# Altium PCB A313_5.PcbDoc (part 3 of 4)
Units mm, origin at the board's own origin, x right, y up, seen from the top; angles counter-clockwise.
Board outline 230.01 x 157.01 mm, 2 copper layers (Top Layer, Bottom Layer); 173 components, 153 nets, 1229 pads, 884 vias.
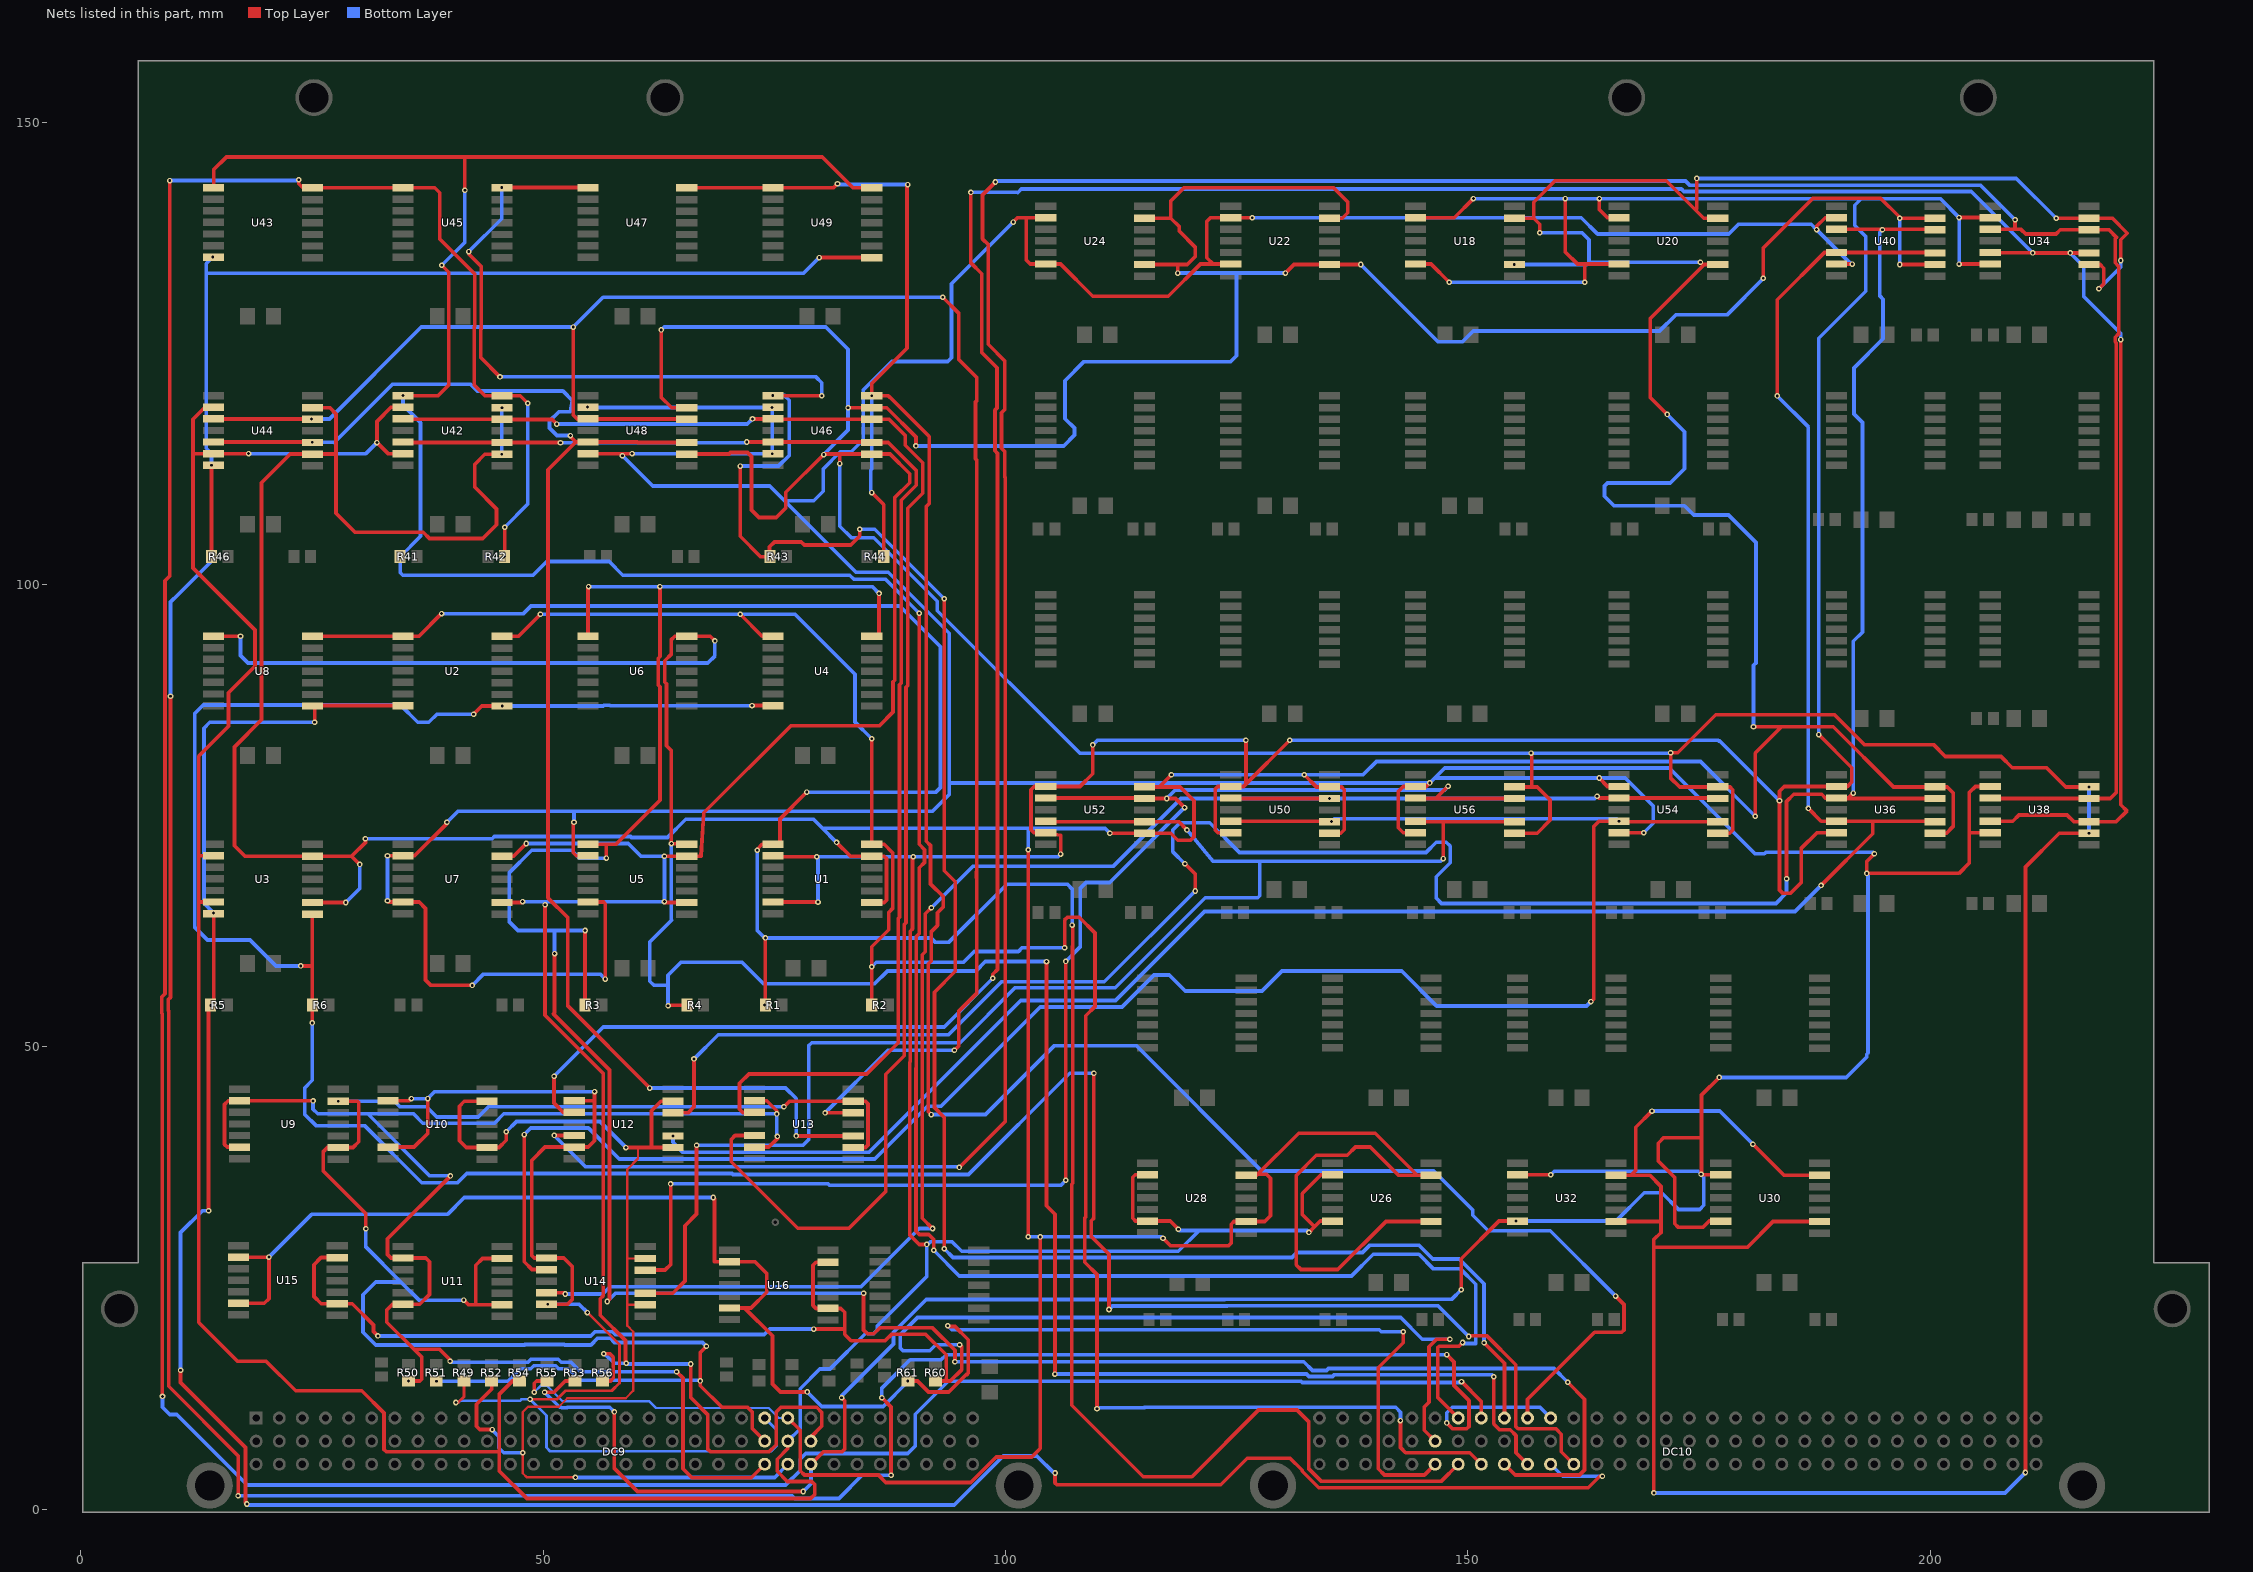
[diagram p3: the nets of this part, all layers, seen from the top]

## Via types
v1: diameter 0.6, hole 0.3, Top Layer to Bottom Layer, 884 vias

## Nets (pads, with @x,y where several pads share a name; then routed paths per layer and width w, separated by ;. In a path a pad name is that pad's centre, name@x,y a point inside that pad or via, vN(x,y) a via of type N, cw(c..) or ccw(c..) an arc to the next point about the centre after c; other vN are vias at no path point) (continued)
u12.3: U12.3 U34.5 U34.10 U38.5 U38.10 | length 355.3
  Top Layer w0.4: v1(51.165,46.807) 51.165,43.91 52.175,42.9 U12.3@53.35,42.9 ; v1(96.25,142.4) 96.25,134.757 97.416,133.591 97.416,125.09 99.081,123.425 99.081,119.082 98.853,118.853 98.853,114.447 99.137,114.162 99.137,58.355 98.625,57.843 v1(98.625,57.4) ; U38.5@206.496,74.4 208.925,74.4 209.6,75.075 214.802,75.075 215.527,74.35 220.11,74.35 221.268,75.508 220.611,76.166 v1(220.611,126.481) ; U34.5@206.496,135.9 211.084,135.873 v1(215.14,135.85) ; v1(211.084,135.85) v1(215.14,135.85) ; U34.10@217.171,135.85 v1(215.14,135.85)
  Bottom Layer w0.4: v1(51.165,46.807) 56.499,52.14 93.365,52.14 v1(98.625,57.4) ; v1(96.25,142.4) 101.273,142.4 101.304,142.369 101.703,142.767 173.088,142.767 173.353,142.502 204.431,142.502 v1(211.084,135.85) ; v1(215.14,135.85) 216.59,134.4 216.59,131.164 220.611,127.143 v1(220.611,126.481)
u12.5: U12.5 U34.3 U34.12 U38.3 U38.12 | length 359.8
  Top Layer w0.4: v1(51.19,40.405) 51.195,40.4 U12.5@53.35,40.4 ; v1(94.98,36.951) 99.98,41.952 99.98,111.511 99.915,111.576 99.915,114.374 99.553,114.736 99.553,118.564 99.915,118.926 99.915,124.178 98.116,125.977 98.116,136.751 97.498,137.37 97.498,142.123 v1(98.9,143.525) v1@98.9,143.5 ; U38.3@206.496,76.9 206.546,76.85 219.465,76.85 220.111,77.496 220.111,126.133 220.011,126.233 220.011,126.73 220.375,127.094 220.375,134.419 220.011,134.783 220.011,137.391 220.154,137.534 219.338,138.35 214.067,138.35 213.618,137.9 210.328,137.9 209.828,138.4 209.25,138.4 ; U34.3@206.496,138.4 209.25,138.4 ; v1(209.178,139.44) 209.178,138.472 209.25,138.4
  Bottom Layer w0.4: v1(51.19,40.405) 54.58,37.016 94.915,37.016 v1(94.98,36.951) ; v1(98.9,143.525) 99.006,143.631 173.532,143.631 174.007,143.156 205.462,143.156 v1(209.178,139.44)
u12.10: U12.10 U36.5 U36.10 U40.5 U40.10 | length 236.4
  Top Layer w0.4: v1(183.448,120.39) 183.448,130.795 188.553,135.9 200.475,135.9 U40.10@200.525,135.85 ; v1(186.825,75.775) 188.2,74.4 193.775,74.4 ; v1(188.2,67.45) 193.775,73.025 193.775,74.4 ; U36.10@200.525,74.35 200.475,74.4 193.775,74.4
  Bottom Layer w0.4: v1(64.025,40.35) 64.025,39.675 65.124,38.576 85.215,38.576 101.636,54.997 111.883,54.997 121.523,64.637 185.387,64.637 v1(188.2,67.45) ; v1(183.448,120.39) 186.825,117.013 v1(186.825,75.775)
u12.12: U12.12 U36.3 U36.12 U40.3 U40.12 | length 256.8
  Top Layer w0.4: U12.12@64.025,42.85 65.649,42.85 66.303,43.504 v1(66.303,48.686) ; v1(119.4,69.793) 120.505,68.688 v1(120.505,66.845) ; v1(184.464,68.167) 184.464,76.524 185.24,77.3 188.26,77.3 188.66,76.9 U36.3@189.85,76.9 ; U40.3@189.85,138.4 v1@194.775,138.4 ; v1(191.677,77.433) 191.144,76.9 U36.3@189.85,76.9 ; v1(194.827,138.348) v1@194.775,138.4 ; U36.12@200.525,76.85 189.9,76.85 U36.3@189.85,76.9 ; U40.12@200.525,138.35 200.475,138.4 v1@194.775,138.4
  Bottom Layer w0.4: v1(66.303,48.686) 68.919,51.302 93.828,51.302 99.549,57.023 110.683,57.023 v1(120.505,66.845) ; v1@119.388,69.781 118.094,71.075 118.094,73.476 118.856,74.238 122.081,74.238 125.307,71.012 145.465,71.012 146.575,72.122 147.659,72.122 148.083,71.698 148.083,69.912 146.567,68.396 146.567,66.085 147.151,65.5 183.321,65.5 184.464,66.643 v1(184.464,68.167) ; v1(191.677,77.433) 191.677,93.847 192.668,94.837 192.668,117.52 191.754,118.434 191.754,123.412 194.903,126.562 194.903,130.837 194.556,131.185 194.556,138.076 v1(194.827,138.348)
u13.3: U13.3 U42.5 U42.10 U46.5 U46.10 | length 143
  Top Layer w0.4: U42.5@34.85,115.4 34.9,115.35 U42.10@45.525,115.35 51.849,115.35 v1(51.866,115.332) ; v1(72.01,115.403) 73.912,115.403 U46.5@74.85,115.4 85.475,115.4 U46.10@85.525,115.35 87.305,115.35 90.338,112.317 90.338,110.72 88.722,109.104 88.722,89.349 88.533,89.16 88.533,64.036 88.381,63.884 88.381,50.443 84.997,47.06 72.247,47.06 71.231,46.044 71.231,43.25 71.581,42.9 U13.3@72.85,42.9
  Bottom Layer w0.4: v1(51.866,115.332) 71.939,115.332 v1(72.01,115.403)
u13.5: U13.5 U42.3 U42.12 U46.3 U46.12 | length 166.1
  Top Layer w0.4: U42.3@34.85,117.9 34.9,117.85 46.766,117.85 46.778,117.838 50.965,117.838 v1(51.461,117.342) ; v1(72.628,117.9) U46.3@74.85,117.9 74.9,117.85 87.41,117.85 89.142,116.117 89.142,115.057 91.038,113.162 91.038,109.86 89.422,108.244 89.422,89.059 89.233,88.87 89.233,63.428 89.035,63.23 89.035,49.021 87.029,47.015 87.029,34.343 83.067,30.38 77.52,30.38 70.325,37.575 70.325,39.975 70.75,40.4 U13.5@72.85,40.4
  Bottom Layer w0.4: v1(51.461,117.342) 72.07,117.342 v1(72.628,117.9)
u13.10: U13.10 U44.5 U44.10 U48.5 U48.10 | length 164.6
  Top Layer w0.4: U44.5@14.35,115.4 24.975,115.4 U44.10@25.025,115.35 v1(25.025,115.375) ; v1(52.943,116.097) 52.943,115.973 53.515,115.4 ; v1(61.528,45.536) 52.663,54.401 52.663,63.951 50.515,66.099 50.515,112.4 53.515,115.4 ; U48.10@65.525,115.35 60.206,115.35 60.156,115.4 53.515,115.4 ; v1(77.352,40.354) 77.356,40.35 U13.10@83.525,40.35
  Bottom Layer w0.4: v1(25.025,115.375) 27.372,115.375 27.397,115.35 33.697,121.65 42.133,121.65 42.865,120.918 52.123,120.918 53.163,119.877 52.901,118.68 51.69,118.68 50.682,117.672 50.682,116.91 51.495,116.097 v1(52.943,116.097) ; v1(61.528,45.536) 76.209,45.536 77.352,44.393 v1(77.352,40.354)
u13.12: U13.12 U44.3 U44.12 U48.3 U48.12 | length 210.3
  Top Layer w0.4: U44.3@14.35,117.9 24.975,117.9 v1(24.95,117.9) ; v1(53.247,127.832) 53.247,118.332 53.679,117.9 65.475,117.9 U48.12@65.525,117.85 ; v1(80.476,42.85) U13.12@83.525,42.85 ; v1(93.208,131.058) 94.95,129.316 94.95,124.292 96.899,122.343 96.899,119.869 96.753,119.723 96.753,113.577 96.899,113.431 96.899,68.99 96.846,68.937 96.846,68.313 96.899,68.26 96.899,55.812 94.95,53.863 94.95,50.104 v1(94.472,49.625)
  Bottom Layer w0.4: v1(24.95,117.9) 26.881,117.9 36.813,127.832 v1(53.247,127.832) 56.473,131.058 v1(93.208,131.058) ; v1(80.476,42.85) 87.252,49.625 v1(94.472,49.625)
u14.3: U14.3 U50.5 U50.10 U54.5 U54.10 | length 220.2
  Top Layer w0.4: v1(47.939,40.507) 47.939,26.74 48.779,25.9 U14.3@50.35,25.9 ; U50.5@124.35,74.4 135.2,74.4 v1(135.25,74.35) ; v1(163.306,54.883) 163.625,55.203 163.625,73.856 164.169,74.4 v1(166.35,74.4) 166.4,74.35 U54.10@177.025,74.35
  Bottom Layer w0.4: v1(47.939,40.507) 48.642,41.21 54.881,41.21 58.226,37.865 85.861,37.865 91.564,43.568 93.012,43.568 103.741,54.297 112.605,54.297 116.062,57.753 117.713,57.753 119.44,56.026 127.746,56.026 129.905,58.185 142.834,58.185 146.619,54.401 162.823,54.401 v1(163.306,54.883) ; v1(135.25,74.35) 135.562,74.662 166.088,74.662 v1(166.35,74.4)
u14.5: U14.5 U50.3 U50.12 U54.3 U54.12 | length 181.1
  Top Layer w0.4: U14.5@50.35,23.4 52.244,23.4 v1(52.384,23.26) ; v1(91.979,65.04) 91.324,64.384 91.324,60.287 90.997,59.96 90.997,31.453 v1(92.103,30.347) ; U50.3@124.35,76.9 124.4,76.85 v1(135.025,76.85) ; v1(163.972,77.102) 164.174,76.9 U54.3@166.35,76.9 176.975,76.9 U54.12@177.025,76.85
  Bottom Layer w0.4: v1(52.384,23.26) 56.406,23.26 57.198,24.052 84.367,24.052 90.662,30.347 v1(92.103,30.347) ; v1(91.979,65.04) 96.445,69.506 111.617,69.506 118.961,76.85 v1(135.025,76.85) 163.72,76.85 v1(163.972,77.102)
u14.10: U14.10 U52.5 U52.10 U56.5 U56.10 | length 161.7
  Top Layer w0.4: U14.10@61.025,23.35 64.017,23.35 65.32,24.653 65.32,30.653 66.582,31.915 v1(66.582,39.338) ; U52.5@104.35,74.4 104.4,74.35 118.718,74.35 v1(119.616,73.452) ; U56.5@144.35,74.4 144.4,74.35 147.25,74.35 ; v1(147.329,70.352) 147.329,74.271 147.25,74.35 ; U56.10@154.975,74.4 U56.10@155.025,74.35 147.25,74.35
  Bottom Layer w0.4: v1(66.582,39.338) 78.089,39.338 78.698,39.948 78.698,50.108 79.028,50.438 95.097,50.438 101.028,56.369 111.858,56.369 121.599,66.11 127.282,66.11 127.5,66.328 127.5,70.065 127.49,70.075 ; v1(119.616,73.452) 122.442,70.075 127.49,70.075 ; v1(147.329,70.352) 147.052,70.075 127.49,70.075
u14.12: U14.12 U52.3 U52.12 U56.3 U56.12 | length 160.8
  Top Layer w0.4: U14.12@61.025,25.85 63.179,25.85 63.788,26.46 63.777,26.471 v1(63.777,35.17) ; U52.3@104.35,76.9 114.975,76.9 U52.12@115.025,76.85 v1(117.433,76.85) 118.377,76.85 v1(119.364,75.864) ; v1(106.511,35.554) v1(106.511,59.227) ; U56.3@144.35,76.9 144.4,76.85 U56.12@155.025,76.85 ; 146.587,76.9 v1(147.862,78.175)
  Bottom Layer w0.4: v1(63.777,35.17) 80.807,35.17 80.942,35.035 105.992,35.035 v1(106.511,35.554) ; v1(106.511,59.227) 108.061,60.776 108.061,67.126 108.689,67.754 111.137,67.754 111.156,67.736 111.236,67.736 v1(119.364,75.864) ; v1(117.433,76.85) 118.36,77.777 147.464,77.777 v1(147.862,78.175)
"upr. c1": DC10.A6 R61.1 U15.2 U15.6 U16.2 U16.6 | length 195
  Top Layer w0.4: U15.6@17.05,22.25 19.821,22.25 20.329,22.758 v1(20.329,27.25) U15.2@17.05,27.25 ; v1(68.382,33.7) 68.514,33.568 68.514,26.774 68.538,26.75 72.911,26.75 74.177,25.484 74.177,23.452 72.475,21.75 71.776,21.75 ; U16.6@70.125,21.75 71.776,21.75 ; v1(78.546,12.668) 75.65,12.668 74.787,13.532 74.787,18.739 71.776,21.75 ; v1(89.425,13.85) 90.483,13.85 91.665,12.668 93.863,12.668 95.756,14.562 95.837,14.562 95.975,14.7 95.975,18.314 94.539,19.75 93.816,19.75 v1(93.735,19.831) ; v1(143,19.175) 143,17.991 140.296,15.287 140.296,4.372 140.972,3.696 145.296,3.696 DC10.A6@146.45,4.85
  Bottom Layer w0.4: v1(20.329,27.25) 24.95,31.871 39.633,31.871 41.462,33.7 v1(68.382,33.7) ; v1(78.546,12.668) 80.11,11.105 86.76,11.105 89.425,13.769 v1(89.425,13.85) ; v1(93.735,19.831) 94.166,19.4 140.425,19.4 140.65,19.175 v1(143,19.175)
"upr. c2": DC10.B6 R60.1 U15.9 U15.13 U16.9 U16.13 | length 183
  Top Layer w0.4: U15.13@27.725,27.2 25.975,27.2 25.2,26.425 25.2,23 26,22.2 U15.9@27.725,22.2 29.35,22.2 31.65,19.9 31.65,19.2 v1(32.125,18.725) ; v1(79.257,19.469) 82.577,19.469 82.596,19.45 ; U16.13@80.8,26.7 79.511,26.7 79.181,26.37 79.181,22.03 79.511,21.7 82.175,21.7 82.596,21.279 82.596,19.45 ; R60.1@92.425,13.85 93.575,13.85 ; v1(95.03,17.774) 95.275,17.529 95.275,15.108 94.017,13.85 93.575,13.85 ; DC10.B6@146.45,7.35 145.272,8.528 145.272,11.043 145.794,11.565 145.794,17.56 146.609,18.375 v1(148.05,18.375) ; 82.596,19.45 82.596,18.891 83.295,18.193 86.951,18.193 87.653,18.895 91.37,18.895 93.579,16.685 93.579,14.858 93.575,14.854 93.575,13.85
  Bottom Layer w0.4: v1(32.125,18.725) 55.137,18.725 55.574,19.163 57.524,19.163 57.816,18.871 73.912,18.871 74.511,19.469 v1(79.257,19.469) ; v1(95.03,17.774) 92.456,17.774 91.796,17.113 88.909,17.113 88.625,17.397 88.625,18.874 90.472,20.72 142.73,20.72 145.075,18.375 v1(148.05,18.375)
"upr. t1": DC9.A23 R50.1 U9.2 U9.6 U11.2 U11.6 U13.2 U13.6 | length 174.3
  Top Layer w0.4: U9.6@17.15,39.15 15.818,39.15 15.528,39.44 15.528,43.758 15.92,44.15 25.093,44.15 v1(25.104,44.139) ; v1(35.425,13.85) 36.65,13.85 36.85,14.05 36.85,16.437 36.012,17.275 ; v1(39.925,15.994) 39.925,16.11 39.938,16.123 38.786,17.275 36.012,17.275 ; v1(39.963,36.036) 33.15,29.223 33.15,27.537 33.537,27.15 37.3,27.15 37.7,26.75 37.7,23.207 36.643,22.15 33.689,22.15 33.075,21.536 33.075,20.212 36.012,17.275 ; v1(64.419,14.853) 65.104,14.168 65.104,4.372 66.076,3.4 72.5,3.4 DC9.A23@73.95,4.85 ; U13.6@72.85,39.15 74.395,39.15 75.325,40.08 v1(75.325,40.3) ; U13.2@72.85,44.15 74.177,44.15 75.244,43.083 v1(75.244,42.742)
  Bottom Layer w0.4: v1(25.104,44.139) 25.104,43.246 25.608,42.742 31.03,42.742 ; v1(39.925,15.994) 40.044,15.876 48.355,15.876 48.676,16.197 51.621,16.197 51.942,15.876 53.002,15.876 54.025,14.853 v1(64.419,14.853) ; v1(39.963,36.036) 37.736,36.036 31.03,42.742 ; v1(75.325,40.3) 75.244,40.381 v1(75.244,42.742) 45.735,42.742 44.731,41.738 36.962,41.738 35.958,42.742 31.03,42.742
"upr. t2": DC9.B23 R51.1 U9.9 U9.13 U11.9 U11.13 U13.9 U13.13 | length 203.6
  Top Layer w0.4: 26.644,39.1 26.222,38.678 26.222,36.544 30.819,31.947 v1(30.819,30.321) ; U9.9@27.825,39.1 29.425,39.1 30.043,39.718 30.043,44.007 29.95,44.1 v1(27.825,44.1) ; R51.1@38.425,13.85 v1(38.45,13.825) ; v1(41.411,22.6) 41.911,22.1 42.7,22.1 ; U11.9@45.525,22.1 42.7,22.1 ; U11.13@45.525,27.1 43.422,27.1 42.697,26.375 42.697,22.703 42.7,22.7 42.7,22.1 ; v1(67.645,17.6) 66.989,16.943 v1(66.989,13.862) 66.989,13.35 69.321,11.017 72.086,11.017 72.619,10.484 72.619,8.681 DC9.B23@73.95,7.35 ; v1(76.031,43.504) 76.627,44.1 84.845,44.1 85.124,43.821 85.124,39.379 84.845,39.1 U13.9@83.525,39.1
  Bottom Layer w0.4: v1(27.825,44.1) 33.904,44.1 34.5,43.504 37.377,43.504 38.487,42.394 42.968,42.394 44.077,43.504 v1(76.031,43.504) ; v1(30.819,30.321) 30.819,28.34 34.598,24.562 ; v1(38.45,13.825) 46.202,13.825 47.552,15.176 48.645,15.176 48.966,15.497 51.331,15.497 51.652,15.176 52.712,15.176 53.954,13.933 66.918,13.933 v1(66.989,13.862) ; v1(41.411,22.6) 36.56,22.6 34.598,24.562 ; v1(67.645,17.6) 67.22,18.025 57.672,18.025 57.235,18.463 55.864,18.463 55.15,17.748 52.332,17.748 52.283,17.797 48.014,17.797 47.965,17.748 31.886,17.748 30.5,19.134 30.5,23.189 31.873,24.562 34.598,24.562
"upr. t3": DC9.C23 R49.1 U10.2 U10.6 U12.2 U12.6 U14.2 U14.6 | length 138.3
  Top Layer w0.3: v1(40.55,11.525) 40.801,11.525 41.425,12.149 R49.1@41.425,13.85 ; v1(48.574,11.881) 51.501,11.881 52.415,12.795 57.413,12.795 58.233,13.615 58.233,17.792 v1(54.775,21.25)
  Top Layer w0.4: U10.6@33.225,39.15 36.025,39.15 37.499,40.624 v1(37.499,44.393) ; U10.2@33.225,44.15 35.504,44.15 v1(35.747,44.393) ; U14.6@50.35,22.15 v1(50.475,22.15) 52.612,22.15 53.138,22.676 53.138,26.24 52.228,27.15 49.031,27.15 48.752,27.429 48.752,37.702 50.199,39.15 54.873,39.15 55.55,39.827 55.55,44.225 ; U12.2@53.35,44.15 55.475,44.15 55.55,44.225 ; v1(55.55,45.15) 55.55,44.225
  Bottom Layer w0.3: v1(40.55,11.525) 40.801,11.525 40.984,11.708 47.474,11.708 47.647,11.881 v1(48.574,11.881) 50.346,10.109 50.346,6.654 50.754,6.246 74.63,6.246 75.225,6.841 75.225,8.575 DC9.C23@73.95,9.85
  Bottom Layer w0.4: v1(35.747,44.393) v1(37.499,44.393) 38.256,45.15 v1(55.55,45.15) ; v1(50.475,22.15) 53.875,22.15 v1(54.775,21.25)
"upr. t4": DC9.A24 R52.1 U10.9 U10.13 U12.9 U12.13 U14.9 U14.13 | length 132.3
  Top Layer w0.254: v1(53.475,3.425) 48.241,3.425 47.786,3.88 v1(47.786,6.09) 47.786,10.484 48.364,11.061 51.671,11.061 52.601,11.99 58.92,11.99 59.742,12.812 59.742,19.175 59.075,19.842 59.075,27.025 ; 59.125,22.1 U14.9@61.025,22.1 ; 60.25,39.1 60.25,37.908 59.075,36.733 59.075,27.025 ; U14.13@61.025,27.1 59.15,27.1 59.075,27.025
  Top Layer w0.4: U10.13@43.9,44.1 41.461,44.1 40.936,43.575 40.936,39.829 41.665,39.1 45.221,39.1 46,39.879 v1(46,40.8) ; R52.1@44.425,13.85 44.425,12.973 42.783,11.331 42.783,8.96 43.143,8.6 v1(44.473,8.6) ; v1(58.937,39.1) 60.25,39.1 61.7,39.1 ; U12.9@64.025,39.1 61.7,39.1 ; U12.13@64.025,44.1 62.747,44.1 61.716,43.069 61.716,39.116 61.7,39.1
  Bottom Layer w0.4: v1(44.473,8.6) 44.473,8.565 45.196,7.842 45.196,6.623 45.729,6.09 v1(47.786,6.09) ; v1(46,40.8) 47.11,41.91 56.127,41.91 v1(58.937,39.1) ; v1(53.475,3.425) 75.025,3.425 DC9.A24@76.45,4.85
"upr. tk1": DC9.B24 R54.2 U1.2 U1.6 U3.2 U3.6 U18.2 U18.6 U20.2 U20.6 U26.2 U26.6 U28.2 U28.6 U34.2 U34.6 U36.2 U36.6 U42.2 U42.6 U44.2 U44.6 U50.2 U50.6 U52.2 U52.6 | length 738.5
  Top Layer w0.4: 12.875,114.15 v1(18.136,114.15) ; U3.6@14.35,65.65 12.784,65.65 12.734,65.7 ; U3.2@14.35,70.65 12.734,70.65 ; U44.6@14.35,114.15 12.125,114.15 ; U44.2@14.35,119.15 13.415,119.15 12.125,117.86 12.125,114.15 ; U42.6@34.85,114.15 33.207,114.15 v1(32.013,115.344) 32.013,117.626 33.537,119.15 U42.2@34.85,119.15 ; R54.2@47.425,13.85 46.682,13.85 45.227,12.395 45.227,6.125 ; U1.6@74.85,65.65 v1(79.714,65.65) ; U1.2@74.85,70.65 74.946,70.554 v1(79.571,70.554) ; DC9.B24@76.45,7.35 76.45,6.551 75.295,5.396 75.295,4.083 76.401,2.977 79.023,2.977 79.35,2.65 79.35,1.575 78.912,1.137 48.244,1.137 45.227,4.153 45.227,6.125 ; v1(90.027,70.555) 89.933,70.461 89.933,62.748 89.689,62.503 89.689,48.373 89.646,48.33 89.646,29.636 90.662,28.62 v1(91.474,28.62) ; v1(105.952,70.834) 105.952,72.871 U52.6@104.35,73.15 103.078,73.15 102.752,73.476 102.752,77.794 103.108,78.15 108.05,78.15 109.432,79.532 v1(109.432,82.645) ; U28.2@115.35,36.15 114.016,36.15 113.75,35.884 113.75,31.455 114.055,31.15 U28.6@115.35,31.15 117.801,31.15 v1(118.69,30.261) ; U50.6@124.35,73.15 122.945,73.15 122.691,73.404 122.691,77.896 122.945,78.15 125.739,78.15 125.993,78.404 ; v1(125.993,83.153) 125.993,78.404 ; v1(130.742,83.153) 125.993,78.404 ; v1(132.808,29.923) 133.422,30.536 ; U26.6@135.35,31.15 134.035,31.15 133.422,30.536 ; U26.2@135.35,36.15 134.121,36.15 132.089,34.118 132.089,31.869 133.422,30.536 ; U18.6@144.35,134.65 146.023,134.65 v1(147.989,132.683) ; U18.2@144.35,139.65 148.523,139.65 v1(150.599,141.726) ; v1(160.537,141.726) 160.537,135.96 161.847,134.65 162.75,134.65 ; v1(162.634,132.683) 162.634,134.534 162.75,134.65 ; v1(164.22,141.726) 164.22,140.532 165.102,139.65 U20.2@166.35,139.65 ; U20.6@166.35,134.65 162.75,134.65 ; v1(187.944,83.763) 191.525,80.182 191.525,78.632 191.043,78.15 184.225,78.15 183.702,77.627 v1(183.702,76.607) 183.702,66.943 184.026,66.618 184.921,66.618 186.062,67.759 186.062,68.884 186.039,68.907 186.039,71.444 187.745,73.15 U36.6@189.85,73.15 ; v1(203.125,134.65) U34.6@206.496,134.65 ; v1(203.125,139.675) 206.471,139.675 U34.2@206.496,139.65 ; 12.125,114.15 12.125,101.779 18.829,95.075 18.829,91.154 15.96,88.285 15.96,84.659 12.734,81.434 12.734,70.65 ; 12.734,65.7 12.734,20.191 16.925,16 20.02,16 23.225,12.795 30.38,12.795 32.775,10.4 32.775,6.445 33.029,6.191 45.161,6.191 45.227,6.125 ; 12.734,65.7 12.734,70.65
  Bottom Layer w0.4: v1(18.136,114.15) 30.819,114.15 v1(32.013,115.344) ; DC9.B24@76.45,7.35 77.784,8.684 77.784,13.024 79.91,15.15 81.025,15.15 84.879,19.004 85.037,19.004 85.091,18.95 85.716,18.95 86.158,19.392 86.158,19.833 91.474,25.149 v1@91.474,28.518 ; v1(79.714,65.65) 79.714,70.411 v1(79.571,70.554) 105.672,70.554 v1(105.952,70.834) ; v1(91.474,28.62) v1@91.474,28.518 ; v1(109.432,82.645) 109.94,83.153 v1(125.993,83.153) ; v1(118.69,30.261) 118.817,30.134 120.94,30.134 ; v1(130.742,83.153) 177.073,83.153 177.166,83.06 177.249,83.06 v1(183.702,76.607) ; v1(132.808,29.923) 132.597,30.134 120.94,30.134 ; v1(147.989,132.683) v1(162.634,132.683) ; v1(150.599,141.726) v1(160.537,141.726) v1(164.22,141.726) 192.55,141.726 ; v1(187.944,83.763) 187.944,126.613 193.029,131.698 193.029,137.631 191.83,138.83 191.83,141.006 192.55,141.726 ; v1(203.125,134.65) v1(203.125,139.675) 201.074,141.726 192.55,141.726 ; v1@91.474,28.518 91.881,28.924 94.218,28.924 95.27,27.872 118.678,27.872 120.94,30.134
"upr. tk2": DC9.C24 R55.2 U1.9 U1.13 U3.9 U3.13 U18.9 U18.13 U20.9 U20.13 U26.9 U26.13 U28.9 U28.13 U34.9 U34.13 U36.9 U36.13 U42.9 U42.13 U44.9 U44.13 U50.9 U50.13 U52.9 U52.13 | length 791.2
  Top Layer w0.4: U3.9@25.025,65.6 v1(28.65,65.6) ; U44.13@25.025,119.1 26.933,119.1 27.593,118.44 27.593,114.075 ; v1(30.159,69.717) 29.276,70.6 ; v1(30.766,72.503) 30.766,72.091 29.276,70.6 ; v1(45.5,114.075) 43.672,114.075 42.579,112.982 42.579,110.535 44.942,108.172 44.942,106.467 43.45,104.975 37.708,104.975 37.033,105.65 29.633,105.65 27.593,107.69 27.593,114.075 ; v1(49.031,12.643) 49.031,13.596 49.285,13.85 R55.2@50.425,13.85 ; DC9.C24@76.45,9.85 77.784,8.516 77.784,4.134 78.241,3.677 86.249,3.677 87.046,2.88 96.24,2.88 99.001,5.641 102.819,5.641 103.743,6.564 v1(103.743,29.432) ; v1(81.721,72.104) 83.225,70.6 86.877,70.6 87.131,70.346 87.131,65.854 86.877,65.6 U1.9@85.525,65.6 ; v1(102.447,29.458) v1(102.447,71.317) ; v1(111.286,73.095) 111.291,73.1 117.865,73.1 118.631,72.334 119.992,72.334 120.372,72.714 120.372,76.609 118.881,78.1 116.62,78.1 ; U52.13@115.025,78.1 116.62,78.1 ; v1(117.027,29.28) 117.814,28.493 124.139,28.493 124.418,28.772 124.418,30.804 124.714,31.1 128.025,31.1 128.66,31.735 128.66,35.778 128.225,36.212 127.256,36.212 ; v1(117.94,79.42) 116.62,78.1 ; U28.13@126.025,36.1 127.144,36.1 127.256,36.212 ; v1(132.293,79.42) 133.613,78.1 136.323,78.1 136.629,77.794 136.629,73.47 136.26,73.1 U50.9@135.025,73.1 ; U26.9@146.025,31.1 141.131,31.1 135.933,25.902 131.937,25.902 131.429,26.41 131.429,36.082 133.601,38.254 136.94,38.254 137.847,39.161 139.442,39.161 142.503,36.1 144.522,36.1 ; U26.13@146.025,36.1 144.522,36.1 ; U18.13@155.025,139.6 157.111,139.6 ; v1(157.762,138.023) 157.762,138.948 157.111,139.6 ; v1(171.561,118.383) 169.706,120.237 169.706,128.733 175.574,134.6 ; 174.761,140.616 v1(174.761,143.91) ; v1(175.142,134.842) 175.384,134.6 175.574,134.6 ; U20.9@177.025,134.6 175.574,134.6 ; U20.13@177.025,139.6 175.515,139.6 171.459,143.656 159.431,143.656 157.111,141.336 157.111,139.6 ; v1(180.887,84.601) 183.93,84.601 ; v1(181.086,74.924) 181.086,81.756 183.93,84.601 ; U36.9@200.525,73.1 201.766,73.1 202.475,73.809 202.475,77.461 201.836,78.1 196.02,78.1 189.518,84.601 183.93,84.601 ; v1(213.623,139.6) 219.711,139.6 221.319,137.992 220.611,137.284 v1(220.611,135.032) ; U34.9@217.171,134.6 218.375,134.6 218.768,134.207 218.768,132.494 v1(218.246,131.972) ; 27.593,114.075 27.568,114.1 22.625,114.1 19.529,111.004 19.529,85.356 16.6,82.427 16.6,71.744 17.744,70.6 29.276,70.6 ; 127.256,36.212 131.695,40.651 139.971,40.651 144.522,36.1
  Bottom Layer w0.254: v1(49.031,12.643) 49.712,13.324 50.431,13.324 52.11,11.644 61.48,11.644 62.193,10.931 74.398,10.931 75.479,9.85 DC9.C24@76.45,9.85
  Bottom Layer w0.4: v1(28.65,65.6) 30.159,67.109 v1(30.159,69.717) ; v1(30.766,72.503) 44.492,72.503 44.727,72.737 59.43,72.737 59.53,72.637 63.446,72.637 65.409,74.6 79.225,74.6 80.205,73.62 ; v1(45.5,114.075) 45.525,114.1 v1(45.525,119.1) ; v1(81.721,72.104) 80.205,73.62 ; v1(102.447,29.458) 116.849,29.458 v1(117.027,29.28) ; v1(102.447,71.317) 102.447,73.598 ; v1(111.286,73.095) 110.783,73.598 102.447,73.598 ; v1(117.94,79.42) v1(132.293,79.42) 138.668,79.42 140.102,80.854 175.155,80.854 v1(181.086,74.924) ; v1(155.025,134.6) 162.805,134.6 162.83,134.575 163.097,134.842 ; v1(157.762,138.023) 162.345,138.023 163.097,137.272 163.097,134.842 ; v1(171.561,118.383) 173.432,116.512 173.432,112.508 171.891,110.966 165.109,110.966 164.779,110.636 164.779,109.53 165.806,108.503 173.415,108.503 174.417,107.5 178.178,107.5 181.15,104.528 181.15,91.513 180.887,91.25 v1(180.887,84.601) ; v1(174.761,143.91) 209.313,143.91 v1(213.623,139.6) ; v1(175.142,134.842) 163.097,134.842 ; v1(218.246,131.972) 220.611,134.337 v1(220.611,135.032) ; 80.205,73.62 102.425,73.62 102.447,73.598
"upr. tk3": DC9.A25 R53.2 U5.2 U5.6 U7.2 U7.6 U22.2 U22.6 U24.2 U24.6 U30.2 U30.6 U32.2 U32.6 U38.2 U38.6 U40.2 U40.6 U46.2 U46.6 U48.2 U48.6 U54.2 U54.6 U56.2 U56.6 | length 813.2
  Top Layer w0.4: v1(33.156,65.781) 33.287,65.65 36.585,65.65 37.271,64.964 37.271,57.22 37.855,56.636 v1(42.325,56.636) ; v1(33.156,70.65) 36.077,70.65 39.582,74.155 v1(39.582,74.289) ; v1(50.149,12.643) 51.165,12.643 52.372,13.85 R53.2@53.425,13.85 ; v1(53.324,74.274) 53.247,74.197 53.247,70.978 53.575,70.65 U5.2@54.85,70.65 ; U5.6@54.85,65.65 56.524,65.65 56.702,65.472 v1(56.702,57.319) ; U48.6@54.85,114.15 58.327,114.15 ; v1(57.692,10.509) 57.692,4.388 60.182,1.899 v1(78.119,1.899) ; v1(58.565,113.913) 58.327,114.15 ; v1(59.606,114.15) 58.327,114.15 ; DC9.A25@78.95,4.85 80.296,6.196 82.305,6.196 82.604,6.495 82.604,11.698 v1(82.268,12.033) ; v1(100.822,139.186) 101.286,139.65 102.275,139.65 ; U24.2@104.35,139.65 102.275,139.65 ; U22.6@124.35,134.65 122.437,134.65 ; v1(126.672,139.65) 122.154,139.65 121.766,139.262 121.766,135.321 122.437,134.65 ; U56.6@144.35,73.15 143.011,73.15 142.475,73.686 142.475,77.614 143.011,78.15 145.501,78.15 v1(145.881,78.531) ; v1(149.287,23.72) 149.287,27.063 153.374,31.15 v1(155.2,31.15) U32.6@155.35,31.15 ; U32.2@155.35,36.15 v1(158.962,36.15) ; v1(164.195,79.064) 165.109,78.15 U54.2@166.35,78.15 ; U54.6@166.35,73.15 v1(169.025,73.15) ; v1(175.225,36.2) 175.275,36.15 U30.2@177.35,36.15 ; v1@175.269,36.271 175.269,40.175 ; v1(177.174,46.679) 175.269,44.774 175.269,40.175 ; U30.6@177.35,31.15 176.098,31.15 175.442,30.494 172.729,30.494 172.375,30.848 172.375,35.854 170.575,37.654 170.575,39.575 171.175,40.175 175.269,40.175 ; v1(187.715,138.373) 187.715,138.729 188.636,139.65 U40.2@189.85,139.65 ; U40.6@189.85,134.65 v1(191.575,134.65) ; v1(193.965,70.883) 193.125,70.043 v1(193.125,68.752) 203.102,68.752 204.225,69.875 204.225,73.175 ; U38.6@206.496,73.15 204.25,73.15 204.225,73.175 ; U38.2@206.496,78.15 204.886,78.15 204.225,77.489 204.225,73.175 ; 102.275,139.65 102.225,139.6 102.225,135.094 102.669,134.65 105.952,134.65 109.44,131.162 117.603,131.162 121.091,134.65 122.437,134.65
  Bottom Layer w0.4: v1(33.156,65.781) v1(33.156,70.65) ; v1(39.582,74.289) 40.751,75.457 53.3,75.457 ; v1(42.325,56.636) 43.545,57.855 56.166,57.855 v1(56.702,57.319) ; v1(50.149,12.643) 51.774,11.017 51.945,11.017 51.991,10.971 52.571,10.971 52.617,11.017 57.184,11.017 v1(57.692,10.509) ; v1(53.324,74.274) 53.324,75.433 53.3,75.457 ; v1(54.8,119.2) 54.875,119.125 v1(74.75,119.125) v1@74.75,114.15 ; v1(58.565,113.913) 61.841,110.636 74.507,110.636 76.082,109.061 ; v1(59.606,114.15) 59.631,114.125 v1(74.775,114.125) ; v1(78.119,1.899) 78.95,2.729 DC9.A25@78.95,4.85 ; v1(82.268,12.033) 82.268,12.243 87.875,17.85 87.875,19.114 91.425,22.663 123.683,22.663 123.726,22.707 148.274,22.707 v1(149.287,23.72) ; v1(100.822,139.186) 94.146,132.51 94.146,124.517 93.735,124.106 87.698,124.106 84.616,121.025 84.616,115.64 83.321,114.345 82.127,114.345 80.273,112.49 80.273,110.077 79.257,109.061 76.082,109.061 ; v1(126.672,139.65) 162.271,139.65 164.03,137.89 178.208,137.89 179.266,138.949 187.139,138.949 v1(187.715,138.373) 191.438,134.65 v1(191.575,134.65) ; v1(155.2,31.15) 166.022,31.15 169.071,34.2 170.975,34.2 172.771,32.404 175.066,32.404 175.519,32.858 175.519,35.906 v1(175.225,36.2) 174.901,36.524 159.336,36.524 v1(158.962,36.15) ; v1(169.025,73.15) 170.037,74.162 170.037,76.041 167.014,79.064 v1(164.195,79.064) 146.415,79.064 ; v1(177.174,46.679) 190.925,46.679 193.125,48.879 193.125,49.185 193.279,49.339 193.279,68.598 v1(193.125,68.752) ; v1(193.965,70.883) 193.827,71.021 182.204,71.021 182.066,70.883 181.037,70.883 171.766,80.154 147.505,80.154 146.415,79.064 ; 53.3,75.457 92.082,75.457 93.9,77.275 93.9,78.525 ; 76.082,109.061 83.829,101.314 87.309,101.314 93.9,94.723 93.9,78.525 ; 93.9,78.525 93.906,78.531 v1(145.881,78.531) 146.415,79.064
"upr. tk4": DC9.B25 R56.2 U5.9 U5.13 U7.9 U7.13 U22.9 U22.13 U24.9 U24.13 U30.9 U30.13 U32.9 U32.13 U38.9 U38.13 U40.9 U40.13 U46.9 U46.13 U48.9 U48.13 U54.9 U54.13 U56.9 U56.13 | length 889.5
  Top Layer w0.4: U7.9@45.525,65.6 47.657,65.6 v1(47.761,65.704) ; U7.13@45.525,70.6 46.786,70.6 v1(48.169,71.983) ; v1(50.199,65.348) 50.199,53.41 56.475,47.134 56.475,23.058 56.168,22.752 56.168,20.96 58.887,18.242 58.887,15.868 v1(58.988,15.767) ; R56.2@56.425,13.85 57.287,13.85 57.583,14.146 57.583,16.434 57.208,16.809 v1(56.549,16.809) ; v1(62.772,127.527) 62.772,120.212 63.884,119.1 U48.13@65.525,119.1 ; v1(63.103,65.704) 63.206,65.6 U5.9@65.525,65.6 ; v1(63.103,70.6) 67.065,70.6 67.37,75.305 76.793,84.728 86.369,84.728 87.833,86.192 87.833,89.45 88.022,89.639 88.022,109.394 89.638,111.01 89.638,111.974 87.511,114.1 82.05,114.1 ; U48.9@65.525,114.1 70.088,114.1 70.256,114.268 72.094,114.268 72.525,113.838 72.525,108.046 73.339,107.233 75.193,107.233 76.234,108.274 76.234,109.959 v1(80.325,114.05) 80.375,114.1 82.05,114.1 ; v1(65.947,15.691) 65.947,12.064 67.776,10.235 67.776,6.496 68.081,6.191 74.423,6.191 75.193,6.961 75.193,10.509 75.701,11.017 79.571,11.017 80.104,10.484 80.104,8.96 78.95,7.806 DC9.B25@78.95,7.35 ; v1(82.076,113.075) 82.076,114.074 82.05,114.1 ; v1(82.965,119.1) 87.15,119.1 90.306,115.944 v1(90.306,114.98) ; U24.9@115.025,134.6 118.55,134.6 ; U24.13@115.025,139.6 115.991,139.6 116.003,139.612 117.865,139.612 ; v1(118.627,133.674) 118.627,134.523 118.55,134.6 ; v1(130.26,133.674) 131.186,134.6 v1(138.402,134.6) ; U22.13@135.025,139.6 136.407,139.6 137,140.193 137,141.361 135.461,142.9 119.291,142.9 117.865,141.474 117.865,139.612 ; U56.9@155.025,73.1 157.494,73.1 158.886,74.492 158.886,76.703 157.489,78.1 156.9,78.1 ; U56.13@155.025,78.1 156.9,78.1 ; v1(156.829,81.756) 156.9,81.685 156.9,78.1 ; U32.9@166.025,31.1 170.812,31.1 170.837,31.075 ; U32.13@166.025,36.1 167.649,36.1 ; v1(169.91,43.047) 168.157,41.294 168.157,36.608 167.649,36.1 ; v1(170.113,1.746) 170.113,28.325 ; U54.9@177.025,73.1 178.317,73.1 178.647,73.43 178.647,77.794 178.341,78.1 U54.13@177.025,78.1 172.9,78.1 171.925,79.075 v1(171.925,81.8) 172.702,81.8 176.802,85.9 189.65,85.9 192.875,82.675 200.35,82.675 201.625,81.4 207.65,81.4 208.868,80.182 212.568,80.182 214.65,78.1 v1(217.171,78.1) ; v1(180.832,39.465) 184.197,36.1 U30.13@188.025,36.1 ; v1(181.95,133.125) 181.95,136.399 187.328,141.777 194.632,141.777 196.707,139.702 v1(196.707,139.6) U40.13@200.525,139.6 ; U30.9@188.025,31.1 183.007,31.1 180.236,28.329 170.117,28.329 170.113,28.325 ; v1(196.707,134.6) U40.9@200.525,134.6 ; v1(210.296,3.956) 210.296,69.442 213.953,73.1 v1(217.171,73.1) ; 117.865,139.612 118.797,138.68 118.797,138.198 120.499,136.496 120.499,135.452 119.647,134.6 118.55,134.6 ; 167.649,36.1 169.681,36.1 170.883,34.898 170.883,29.888 170.848,29.888 170.113,29.153 170.113,28.325
  Bottom Layer w0.4: v1(47.761,65.704) 47.769,65.696 63.095,65.696 v1(63.103,65.704) v1(63.103,70.6) 60.578,70.6 59.194,71.983 v1(48.169,71.983) ; v1(56.549,16.809) 56.626,16.809 57.667,15.767 v1(58.988,15.767) 59.064,15.691 v1(65.947,15.691) ; v1(62.772,127.527) 63.095,127.85 80.56,127.85 82.965,125.444 v1(82.965,119.1) 82.965,116.707 80.325,114.066 v1(80.325,114.05) ; v1(82.076,113.075) 82.076,106.305 83.332,105.05 85.732,105.05 92.605,98.177 92.605,97.161 108.01,81.756 v1(156.829,81.756) 171.881,81.756 v1(171.925,81.8) ; v1(90.306,114.98) 106.283,114.98 107.451,116.148 107.451,116.91 106.435,117.926 106.435,122.041 108.492,124.098 124.342,124.098 124.977,124.733 124.977,133.651 125,133.674 ; v1(118.627,133.674) 125,133.674 ; v1(130.26,133.674) 125,133.674 ; v1(138.402,134.6) 146.756,126.246 149.426,126.246 150.58,127.4 170.722,127.4 172.475,129.153 178.012,129.153 181.95,133.091 v1(181.95,133.125) ; v1(169.91,43.047) 177.25,43.047 v1(180.832,39.465) ; v1(170.113,1.746) 208.086,1.746 v1(210.296,3.956) ; v1(196.707,134.6) v1(196.707,139.6) ; v1(217.171,73.1) v1(217.171,78.1)
vih.1a=: DC10.A7 R1.2 U1.1 U2.1 U8.14 | length 274.8
  Top Layer w0.4: U8.14@25.025,94.4 36.56,94.4 v1(39.004,96.844) ; v1(73.136,71.241) 73.136,71.367 73.669,71.9 75.599,71.9 75.599,74.644 v1(78.495,77.54) ; R1.2@74.025,54.5 v1(74.025,61.767) ; v1(107.197,63.164) 107.273,63.087 107.273,60.877 107.248,60.852 107.248,59.556 107.265,59.539 107.265,35.241 107.162,35.139 107.162,11.238 114.9,3.5 120.15,3.5 127.363,10.713 131.53,10.713 132.775,9.468 132.775,4.388 134.167,2.996 147.096,2.996 DC10.A7@148.95,4.85
  Bottom Layer w0.4: v1(39.004,96.844) 47.863,96.844 48.679,97.661 88.562,97.661 92.973,93.25 92.973,78.048 92.465,77.54 v1(78.495,77.54) ; v1(73.136,71.241) 73.136,62.579 73.948,61.767 v1(74.025,61.767) 91.928,61.767 92.378,61.317 93.886,61.317 100.151,67.583 106.689,67.583 107.197,67.075 v1(107.197,63.164)
  other v1: 73.925,54.525
vih.1b=: DC10.C7 R41.2 U42.1 U43.1 U49.14 | length 338.9
  Top Layer w0.4: U43.1@14.35,142.9 14.35,144.85 15.736,146.236 41.5,146.236 ; U42.1@34.85,120.4 38.627,120.4 39.785,121.558 39.785,133.75 v1(39.023,134.512) ; v1(41.525,142.625) 41.525,146.211 41.5,146.236 ; U49.14@85.525,142.9 83.499,142.9 80.163,146.236 41.5,146.236 ; v1(90.662,96.895) 90.662,71.892 91.237,71.317 91.237,69.937 90.662,69.361 90.662,62.238 90.343,61.919 90.343,47.684 90.314,47.655 90.314,30.06 90.687,29.686 91.703,29.686 92.228,29.161 v1(92.228,27.985) ; DC10.C7@148.95,9.85 146.745,12.055 146.745,17.469 146.897,17.621 149.03,17.621 v1(149.424,18.015)
  Bottom Layer w0.4: v1(34.825,120.425) 34.825,119.4 36.725,117.5 36.725,105.2 v1(34.525,103) 34.525,101.289 34.814,101 48.901,101 50.372,102.471 57.137,102.471 58.608,101 83.153,101 83.6,100.552 87.004,100.552 v1(90.662,96.895) ; v1(39.023,134.512) 41.525,137.014 v1(41.525,142.625) ; v1(92.228,27.985) 94.997,25.216 137.423,25.216 139.773,27.566 144.699,27.566 146.288,25.978 149.202,25.978 150.86,24.321 150.86,17.901 149.539,17.901 v1(149.424,18.015)
vih.2a=: DC10.A8 R2.2 U1.14 U2.14 U4.1 | length 213.3
  Top Layer w0.4: U2.14@45.525,94.4 47.324,94.4 v1(49.691,96.768) ; v1(71.301,96.768) 73.669,94.4 U4.1@74.85,94.4 ; R2.2@85.525,54.5 v1(85.525,58.662) 85.525,60.821 87.36,62.656 87.36,64.516 87.785,64.942 87.785,70.992 86.877,71.9 U1.14@85.531,71.9 ; U1.14@85.525,71.9 U1.14@85.531,71.9 ; v1(85.531,83.306) U1.14@85.531,71.9 ; v1(106.384,60.7) 106.384,63.697 106.689,64.002 107.959,64.002 109.661,62.3 109.661,54.342 108.665,53.346 108.665,31.578 108.562,31.475 108.562,26.695 109.889,25.368 v1(109.889,10.84) ; v1(142.706,9.57) 142.706,6.649 143.265,6.09 150.21,6.09 DC10.A8@151.45,4.85
  Bottom Layer w0.4: v1(49.691,96.768) v1(71.301,96.768) 77.229,96.768 83.707,90.29 83.707,85.13 v1(85.531,83.306) ; v1(85.525,58.662) 86.013,59.15 95.458,59.15 96.607,60.3 101.387,60.3 101.787,60.7 v1(106.384,60.7) ; v1(109.889,10.84) 110.008,10.958 115.025,10.958 ; 115.025,11.004 142.186,11.004 142.706,10.484 v1(142.706,9.57)
vih.2b=: DC10.C8 R42.2 U42.14 U43.14 U45.1 | length 366
  Top Layer w0.4: v1(8.823,12.182) 8.79,12.215 8.79,53.572 8.752,53.61 8.752,55.394 9.086,55.729 9.086,100.386 9.6,100.9 v1(9.6,143.675) ; v1(23.555,143.758) 23.555,143.345 24,142.9 38.261,142.9 38.795,142.367 38.795,137.357 42.579,133.573 42.579,127.912 42.54,127.873 42.54,121.557 43.697,120.4 47.522,120.4 v1(48.32,119.602) ; R42.2@45.825,103 v1(45.825,106.191) ; v1(149.31,13.786) 151.45,11.646 DC10.C8@151.45,9.85
  Bottom Layer w0.4: v1(8.823,12.182) 8.823,11.002 9.599,10.226 10.375,10.226 17.991,2.61 76.209,2.61 77.784,4.185 77.784,5.404 78.393,6.014 89.417,6.014 90.23,6.826 90.23,10.262 93.8,13.832 131.941,13.832 132.094,13.68 149.204,13.68 v1(149.31,13.786) ; v1(9.6,143.675) 23.472,143.675 v1(23.555,143.758) ; v1(45.825,106.191) 48.32,108.686 v1(48.32,119.602)
  other v1: 45.775,102.991
vih.3a=: DC10.A9 R3.2 U4.14 U5.1 U6.1 | length 285.3
  Top Layer w0.4: v1(51.225,60.075) 51.225,53.665 51.114,53.553 57.175,47.492 57.175,22.692 v1(56.93,22.447) ; 54.517,59.43 54.525,59.422 ; R3.2@54.525,54.5 54.525,59.422 ; v1(54.525,62.572) 54.525,59.422 ; U5.1@54.85,71.9 56.85,71.9 ; U6.1@54.85,94.4 54.848,94.4 54.848,99.714 v1(54.898,99.765) ; v1(56.829,70.403) 56.829,71.879 56.85,71.9 ; v1(62.62,99.765) 62.62,92.219 62.428,92.027 62.428,89.125 62.62,88.933 62.62,76.65 57.87,71.9 56.85,71.9 ; v1(84.642,23.33) 84.642,19.374 85.066,18.95 85.751,18.95 86.396,19.595 92.091,19.595 94.521,17.165 v1(94.521,15.945) ; U4.14@85.525,94.4 86.318,94.4 v1(86.318,99.028) ; DC10.A9@153.95,4.85 155.123,3.677 162.061,3.677 162.62,4.236 162.62,11.881 v1(160.791,13.71)
  Bottom Layer w0.4: v1(51.225,60.075) 51.225,62.461 51.114,62.572 ; v1(54.525,62.572) 51.114,62.572 ; v1(54.898,99.765) v1(62.62,99.765) 85.582,99.765 v1(86.318,99.028) ; v1(56.829,70.403) 53.919,70.403 53.074,71.247 48.75,71.247 46.307,68.804 46.307,63.54 47.275,62.572 51.114,62.572 ; v1(56.93,22.447) 57.813,23.33 v1(84.642,23.33) ; v1(94.521,15.945) 132.239,15.945 133.196,14.988 134.704,14.988 134.914,15.197 159.303,15.197 v1(160.791,13.71)
vih.3b=: DC10.C9 R43.2 U45.14 U46.1 U47.1 | length 273.1
  Top Layer w0.4: v1(41.95,136) 41.95,135.75 43.279,134.421 43.279,127.622 43.24,127.583 43.24,124.53 v1(45.323,122.447) ; v1(45.5,142.925) 54.825,142.925 U47.1@54.85,142.9 ; v1(71.3,112.8) 71.3,105.2 73.5,103 v1(74.475,103) ; R43.2@74.475,103.05 74.475,104.075 75,104.6 77.915,104.6 78.243,104.272 83.247,104.272 84.225,105.25 v1@84.225,105.963 ; U46.1@74.85,120.4 v1(80.125,120.4) ; v1(93.379,28.156) 93.379,42.345 92.305,43.42 92.305,55.904 94.557,58.157 94.557,67.853 93.379,69.031 v1(93.379,98.444) ; v1(151.749,17.977) 153.95,15.776 DC10.C9@153.95,9.85
  Bottom Layer w0.4: v1(41.95,136) 45.5,139.55 v1(45.5,142.925) ; v1(45.323,122.447) 79.5,122.447 80.125,121.822 v1(80.125,120.4) ; v1(71.3,112.8) 75.45,112.8 75.455,112.795 76.613,113.952 76.613,119.908 76.095,120.425 v1(74.825,120.425) ; v1(84.235,105.963) 85.861,105.963 v1(93.379,98.444) ; v1(93.379,28.156) 94.317,27.218 130.983,27.218 131.513,27.748 138.609,27.748 139.41,28.549 144.695,28.549 146.2,27.045 149.061,27.045 151.749,24.357 v1(151.749,17.977)
vih.4a=: DC10.A10 R4.2 U5.14 U6.14 U8.1 | length 259.4
  Top Layer w0.4: U8.1@14.35,94.4 v1(17.256,94.4) ; v1(63.5,54.426) 63.574,54.5 R4.2@65.525,54.5 ; U5.14@65.525,71.9 64.804,71.9 64.673,71.768 64.466,71.975 64.46,71.968 v1(63.857,71.968) 63.857,82.018 63.32,82.555 63.32,89.223 63.128,89.415 63.128,91.737 63.857,92.465 63.857,94.042 64.215,94.4 68.056,94.4 v1(68.564,93.892) ; v1(104.428,59.212) 104.428,32.807 105.343,31.893 v1(105.343,14.599) ; v1(152.79,14.319) 152.79,9.214 153.425,8.579 154.568,8.579 155.203,7.944 155.203,6.097 DC10.A10@156.45,4.85
  Bottom Layer w0.4: v1(17.256,94.4) 17.256,92.323 18.076,91.502 67.794,91.502 68.564,92.272 v1(68.564,93.892) ; v1(63.5,54.426) 63.5,56.65 ; v1(63.857,71.968) 63.857,63.68 63.865,63.672 61.528,61.335 61.528,57.097 61.975,56.65 63.5,56.65 ; v1(104.428,59.212) 97.806,59.212 96.79,58.196 87.218,58.196 85.836,56.814 73.821,56.814 71.485,59.15 64.906,59.15 63.5,57.744 63.5,56.65 ; v1(105.343,14.599) 132.542,14.599 132.807,14.334 135.358,14.334 135.568,14.543 152.566,14.543 v1(152.79,14.319)
vih.4b=: DC10.C10 R44.2 U46.14 U47.14 U49.1 | length 258.1
  Top Layer w0.4: U47.14@65.525,142.9 81.396,142.9 v1(81.822,143.326) ; v1(85.529,109.929) 86.825,108.633 R44.2@86.825,103 ; 87.439,120.275 87.314,120.4 ; v1(89.425,143.25) 89.349,143.174 89.349,125.549 85.525,121.725 v1(85.525,120.4) 87.314,120.4 ; v1(91.957,42.666) 91.651,42.972 91.651,58.979 91.978,59.306 91.978,62.472 92.633,63.128 92.633,64.486 93.249,65.101 93.249,66.253 91.891,67.612 91.891,71.758 91.425,72.224 91.425,108.431 91.738,108.744 91.738,115.987 87.325,120.4 87.314,120.4 ; DC10.C10@156.45,9.85 156.45,11.869 163.705,19.124 166.633,19.124 166.887,19.378 166.887,22.12 v1(165.973,23.034)
  Bottom Layer w0.4: v1(81.822,143.326) 81.898,143.25 v1(89.425,143.25) ; v1(85.525,120.4) 85.529,120.396 85.529,112.454 85.417,112.342 85.417,110.048 85.529,109.936 v1(85.529,109.929) ; v1(91.957,42.666) 97.841,42.666 105.3,50.125 114.125,50.125 127.689,36.561 146.296,36.561 150.517,32.341 150.517,31.782 152.198,30.101 158.906,30.101 v1(165.973,23.034)
  other v1: 86.8,102.975
vih.5a=: DC10.A11 R5.1 U2.7 U3.7 U8.8 | length 274.8
  Top Layer w0.4: v1(10.775,15.025) 10.775,13.688 17.796,6.667 17.796,0.704 v1(17.95,0.55) ; v1(13.8,32.275) 13.8,54.275 14.35,54.825 U3.7@14.35,64.4 13.496,64.4 13.571,64.475 v1(14.35,64.475) ; v1(25.275,85.1) 25.275,86.6 U8.8@25.025,86.85 25.075,86.9 U2.7@34.85,86.9 ; v1(105.35,3.9) 105.35,2.831 105.556,2.625 123.265,2.625 126.145,5.506 130.768,5.506 132.075,4.199 132.075,4.098 133.877,2.296 163.017,2.296 164.271,3.55 v1(164.55,3.55)
  Bottom Layer w0.4: v1(10.775,15.025) 10.775,29.915 13.135,32.275 v1(13.8,32.275) ; v1(14.35,64.475) 13.3,65.525 13.3,84.456 13.944,85.1 v1(25.275,85.1) ; v1(17.95,0.55) 18.055,0.445 94.445,0.445 99.75,5.75 102.661,5.75 102.668,5.743 103.382,5.743 105.225,3.9 v1(105.35,3.9) ; DC10.A11@158.95,4.85 160.25,3.55 v1(164.55,3.55)
  other v1: 14.05,54.464
vih.5b=: DC10.C11 R46.1 U43.7 U44.7 U49.8 | length 381.8
  Top Layer w0.4: v1(9.686,87.903) 9.686,55.339 9.452,55.104 9.452,53.9 9.49,53.862 9.49,13.272 16.999,5.762 v1(16.999,1.443) ; U44.7@13.547,112.9 v1(14.125,112.9) R46.1@14.125,103 ; v1(14.25,135.4) U43.7@14.35,135.4 ; v1(79.842,135.35) U49.8@85.525,135.35 ; v1(86.623,12.033) 87.614,11.043 v1(87.614,3.651) ; v1(147.71,9.316) 148.345,8.681 149.869,8.681 150.123,8.935 150.123,11.729 148.497,13.354 148.497,15.92 v1(147.71,16.707)
  Bottom Layer w0.4: v1(9.686,87.903) 9.686,98.114 10.004,98.432 10.043,98.432 14.125,102.513 v1(14.125,103.075) ; v1(14.125,112.9) 14.125,114.154 13.554,114.725 13.554,116.962 13.547,116.969 13.547,133.65 ; v1(14.25,135.4) 13.547,134.697 13.547,133.65 ; v1(16.999,1.443) 76.894,1.443 77.193,1.145 81.975,1.145 84.481,3.651 v1(87.614,3.651) ; v1(79.842,135.35) 78.14,133.649 13.549,133.649 13.547,133.65 ; v1(86.623,12.033) 86.623,13.098 89.675,16.15 93.026,16.15 93.575,16.699 147.702,16.699 v1(147.71,16.707) ; v1(147.71,9.316) 147.71,10.408 148.306,11.004 157.796,11.004 DC10.C11@158.95,9.85
vih.6a=: DC10.A12 R6.1 U2.8 U3.8 U4.7 | length 306.6
  Top Layer w0.4: v1(23.783,58.744) 25.006,58.744 25.025,58.725 ; v1(25.025,52.575) R6.1@25.025,54.5 25.025,58.725 ; U3.8@25.025,64.35 25.025,58.725 ; v1(42.464,85.973) 43.341,86.85 v1(45.577,86.85) ; v1(72.577,86.9) U4.7@74.85,86.9 ; v1(109.55,47.125) 109.55,31.473 109.262,31.185 109.262,29.475 111.185,27.553 v1(111.185,21.584) ; v1(150.099,18.663) 150.169,18.733 150.17,18.731 152.061,18.731 155.178,15.615 155.178,8.935 155.432,8.681 159.521,8.681 160.105,8.096 160.105,6.195 DC10.A12@161.45,4.85
  Bottom Layer w0.4: v1(23.783,58.744) 21.091,58.744 18.285,61.55 13.679,61.55 12.325,62.904 12.325,86.071 13.217,86.963 34.553,86.963 36.425,85.092 37.626,85.092 38.507,85.973 v1(42.464,85.973) ; v1(25.025,52.575) 25.025,46.375 24.2,45.55 24.2,42.681 25.409,41.472 30.667,41.472 36.856,35.282 40.717,35.282 41.725,36.29 70.418,36.29 70.519,36.189 95.996,36.189 106.932,47.125 v1(109.55,47.125) ; v1(45.577,86.85) 56.475,86.85 56.555,86.93 57.179,86.93 57.233,86.876 72.553,86.876 v1(72.577,86.9) ; v1(111.185,21.584) 111.564,21.963 123.973,21.963 124.009,22 146.762,22 v1(150.099,18.663)